# Altium PCB HONGGAN_拼版.PcbDoc (part 4 of 5)
Units mm, origin at the board's own origin, x right, y up, seen from the top; angles counter-clockwise.
Board outline 106.01 x 72.01 mm, 4 copper layers (Top Layer, Mid-Layer 1, Mid-Layer 2, Bottom Layer); 400 components, 0 nets, 1244 pads, 3211 vias.
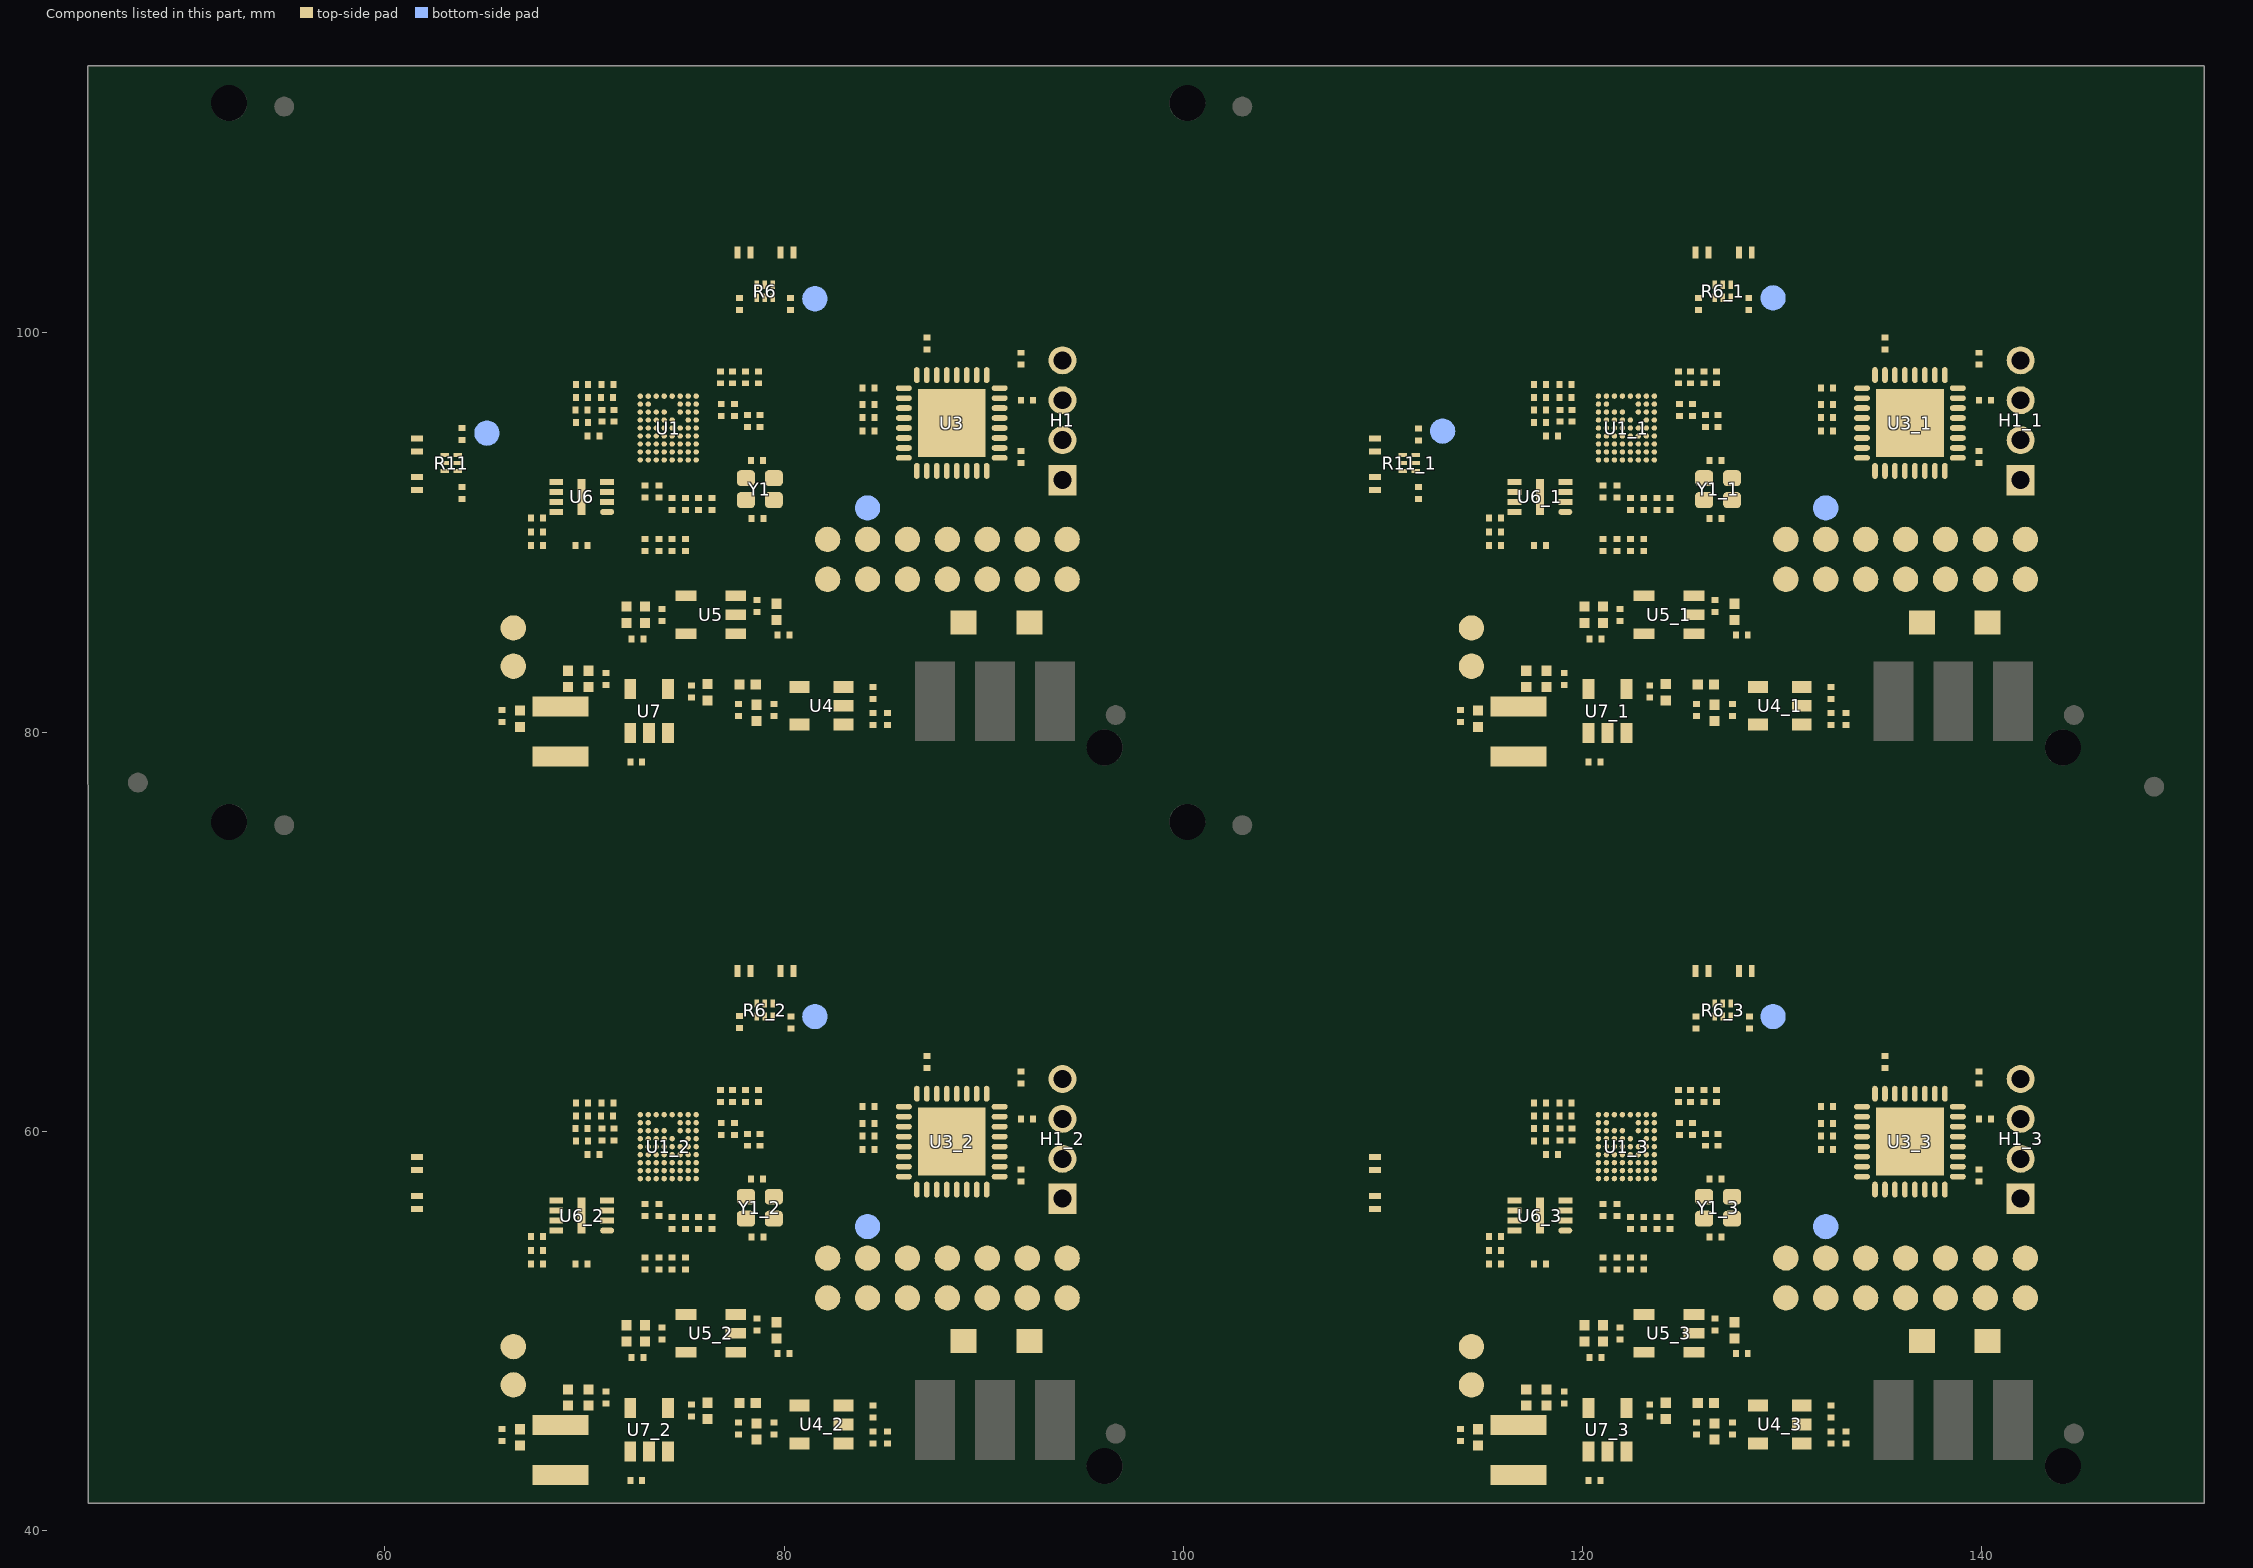
[diagram p6: the components of this part, seen from the top]

## Via types
v1: diameter 0.3, hole 0.2, Top Layer to Bottom Layer, tented both sides, 3151 vias
v2: diameter 0.5, hole 0.3, Top Layer to Bottom Layer, tented both sides, 48 vias
v3: diameter 0.3, hole 0.2, Top Layer to Bottom Layer, 12 vias

## Nets (pads, with @x,y where several pads share a name; then routed paths per layer and width w, separated by ;. In a path a pad name is that pad's centre, name@x,y a point inside that pad or via, vN(x,y) a via of type N, cw(c..) or ccw(c..) an arc to the next point about the centre after c; other vN are vias at no path point) (continued)
copper on no net: (continued)
  other v1: 51.929,42.384 52.413,42.384 52.932,42.384 53.45,42.384 53.993,42.384 54.511,42.384 55.03,42.384 55.549,42.384 56.067,42.384 56.586,42.384 57.105,42.384 57.623,42.384 58.142,42.384 58.661,42.384 59.179,42.384 59.698,42.384 60.217,42.384 60.735,42.384 61.17,42.384 61.811,42.384 62.446,42.384 62.954,42.384 63.589,42.384 64.269,42.384 99.929,42.384 100.413,42.384 100.932,42.384 101.45,42.384 101.993,42.384 102.511,42.384 103.03,42.384 103.549,42.384 104.067,42.384 104.586,42.384 105.105,42.384 105.623,42.384 106.142,42.384 106.661,42.384 107.179,42.384 107.698,42.384 108.217,42.384 108.735,42.384 109.17,42.384 109.811,42.384 110.446,42.384 110.954,42.384 111.589,42.384 112.269,42.384 50.889,42.824 53.454,42.83 65.113,42.824 75.273,42.824 77.305,42.824 79.337,42.824 81.369,42.824 83.401,42.824 85.433,42.824 87.465,42.824 89.497,42.824 91.529,42.824 93.561,42.824 98.889,42.824 113.113,42.824 123.273,42.824 125.305,42.824 127.337,42.824 129.369,42.824 131.401,42.824 133.433,42.824 135.465,42.824 137.497,42.824 139.529,42.824 141.561,42.824 62.9,42.86 51.905,42.87 99.905,42.87 64.269,43.076 112.269,43.076 53.454,43.365 51.905,43.389 62.9,43.395 99.905,43.389 64.269,43.595 112.269,43.595 77.076,43.796 125.076,43.796 53.454,43.9 51.905,43.908 99.905,43.908 62.9,43.93 125.054,44.061 64.269,44.114 112.269,44.114 106.144,44.218 77.076,44.262 77.479,44.262 125.479,44.262 51.929,44.387 99.929,44.387 125.076,44.387 53.454,44.435 62.9,44.465 64.269,44.544 112.269,44.544 77.076,44.705 125.076,44.705 74.257,44.856 122.257,44.856 51.929,44.906 99.929,44.906 53.454,44.97 62.9,45 65.494,45.076 113.494,45.076 64.269,45.145 112.269,45.145 51.929,45.424 99.929,45.424 65.494,45.432 113.494,45.432 65.75,45.455 113.75,45.455 53.454,45.505 62.9,45.535 64.269,45.785 112.269,45.785 51.929,45.943 99.929,45.943 53.454,46.04 62.9,46.07 64.269,46.297 112.269,46.297 51.929,46.462 99.929,46.462 53.454,46.575 62.9,46.605 64.269,46.752 112.269,46.751 50.889,46.888 85.433,46.888 95.593,46.888 98.889,46.888 133.433,46.888 143.593,46.888 51.929,46.98 99.929,46.98 53.454,47.11 62.9,47.14 64.269,47.268 112.269,47.268 51.929,47.499 99.929,47.499 53.454,47.645 62.9,47.675 64.269,47.862 72.987,47.845 73.283,47.845 112.269,47.862 120.987,47.845 121.283,47.845 51.929,48.018 99.929,48.018 72.946,48.099 120.946,48.099 53.454,48.18 62.9,48.21 78.854,48.319 79.362,48.319 79.743,48.319 126.854,48.319 127.362,48.319 127.743,48.319 64.269,48.463 112.269,48.463 51.929,48.536 99.929,48.536 53.454,48.715 62.9,48.745 68.161,48.92 84.417,48.92 86.449,48.92 90.513,48.92 94.577,48.92 96.609,48.92 116.161,48.92 132.417,48.92 134.449,48.92 138.513,48.92 142.577,48.92 144.609,48.92 51.929,49.055 99.929,49.055 64.269,49.102 112.269,49.102 53.454,49.25 62.9,49.28 51.929,49.574 99.929,49.574 64.269,49.614 112.269,49.614 51.929,50.082 52.413,50.082 52.932,50.082 53.45,50.082 53.993,50.082 54.511,50.082 55.03,50.082 55.549,50.082 56.067,50.082 56.586,50.082 57.105,50.082 57.623,50.082 58.142,50.082 58.661,50.082 59.179,50.082 59.698,50.082 60.217,50.082 60.735,50.082 61.17,50.082 62.126,50.082 62.594,50.082 63.113,50.082 63.632,50.082 99.929,50.082 100.413,50.082 100.932,50.082 101.45,50.082 101.993,50.082 102.511,50.082 103.03,50.082 103.549,50.082 104.067,50.082 104.586,50.082 105.105,50.082 105.623,50.082 106.142,50.082 106.661,50.082 107.179,50.082 107.698,50.082 108.217,50.082 108.735,50.082 109.17,50.082 110.126,50.082 110.594,50.082 111.113,50.082 111.632,50.082 64.269,50.13 112.269,50.13 61.039,50.861 62.219,50.861 109.039,50.861 110.219,50.861 50.889,50.952 52.921,50.952 54.953,50.952 56.985,50.952 59.017,50.952 63.081,50.952 65.113,50.952 67.145,50.952 69.177,50.952 71.209,50.952 73.241,50.952 81.369,50.952 98.889,50.952 100.921,50.952 102.953,50.952 104.985,50.952 107.017,50.952 111.081,50.952 113.113,50.952 115.145,50.952 117.177,50.952 119.209,50.952 121.241,50.952 129.369,50.952 61.039,51.379 62.219,51.379 109.039,51.379 110.219,51.379 61.039,51.898 62.219,51.898 109.039,51.898 110.219,51.898 61.039,52.417 62.219,52.417 109.039,52.417 110.219,52.417 61.04,52.961 62.219,52.961 109.04,52.961 110.219,52.961 51.905,52.984 53.937,52.984 55.969,52.984 58.001,52.984 60.033,52.984 64.097,52.984 96.609,52.984 99.905,52.984 101.937,52.984 103.969,52.984 106.001,52.984 108.033,52.984 112.097,52.984 144.609,52.984 61.04,53.48 62.219,53.48 109.04,53.48 110.219,53.48 61.04,53.998 62.219,53.998 109.04,53.998 110.219,53.998 78.084,54.188 78.666,54.188 79.292,54.188 126.084,54.188 126.666,54.188 127.292,54.188 77.59,54.406 125.59,54.406 61.04,54.517 62.219,54.517 109.04,54.517 110.219,54.517 79.613,54.667 127.613,54.667 77.59,54.856 125.59,54.856 80.223,54.988 128.223,54.988 50.889,55.016 52.921,55.016 54.953,55.016 56.985,55.016 59.017,55.016 63.081,55.016 65.113,55.016 87.465,55.016 93.561,55.016 98.889,55.016 100.921,55.016 102.953,55.016 104.985,55.016 107.017,55.016 111.081,55.016 113.113,55.016 135.465,55.016 141.561,55.016 61.04,55.036 62.219,55.036 109.04,55.036 110.219,55.036 69.304,55.084 117.304,55.084 76.382,55.118 124.382,55.118 70.256,55.267 118.256,55.267 77.305,55.306 125.305,55.306 61.039,55.521 62.214,55.515 62.214,55.515 109.039,55.521 110.214,55.515 110.214,55.515 110.608,55.602 62.608,55.631 80.223,55.623 128.223,55.623 76.925,55.789 124.925,55.789 63.306,55.856 111.306,55.856 70.312,55.868 118.312,55.868 112.019,56 64.019,56.088 80.223,56.173 128.223,56.173 76.797,56.323 124.797,56.323 64.766,56.4 112.766,56.4 69.354,56.561 117.354,56.561 62.391,56.694 110.391,56.694 80.223,56.723 128.223,56.723 62.903,56.787 65.336,56.787 110.903,56.787 113.244,56.787 76.797,56.923 124.797,56.923 63.492,56.942 111.492,56.942 51.905,57.048 53.937,57.048 55.969,57.048 58.001,57.048 60.033,57.048 68.161,57.048 96.609,57.048 99.905,57.048 101.937,57.048 103.969,57.048 106.001,57.048 108.033,57.048 116.161,57.048 144.609,57.048 64.019,57.159 112.019,57.159 80.156,57.19 128.156,57.19 65.704,57.265 62.374,57.313 62.374,57.313 110.374,57.313 110.374,57.313 76.574,57.43 124.574,57.43 79.734,57.512 127.734,57.512 64.562,57.562 112.562,57.562 62.329,57.608 110.329,57.608 66.097,57.64 75.192,57.633 114.097,57.629 123.192,57.633 63.042,57.748 111.042,57.748 62.332,57.905 110.332,57.905 79.412,57.934 127.412,57.934 65.042,57.965 113.042,57.965 63.833,58.074 111.833,58.074 66.515,58.147 114.515,58.147 60.806,58.216 62.483,58.216 63.075,58.216 108.733,58.216 110.483,58.216 111.081,58.216 64.35,58.312 79.04,58.306 112.35,58.312 127.04,58.306 60.01,58.391 91.91,58.386 139.91,58.386 73.592,58.433 73.992,58.433 74.392,58.433 74.792,58.433 108.033,58.413 121.592,58.433 121.992,58.433 122.392,58.433 122.792,58.433 65.569,58.461 113.569,58.461 77.512,58.536 78.084,58.536 78.575,58.536 125.512,58.536 126.084,58.536 126.575,58.536 77.024,58.626 87.506,58.635 88.396,58.635 89.285,58.635 125.024,58.626 135.506,58.635 136.396,58.635 137.285,58.635 67.073,58.658 115.073,58.658 59.309,58.716 64.766,58.728 112.766,58.728 73.592,58.833 73.992,58.833 74.392,58.833 74.792,58.833 75.192,58.833 121.592,58.833 121.992,58.833 122.392,58.833 122.792,58.833 123.192,58.833 107.269,58.866 76.797,58.894 124.797,58.894 66.097,58.926 114.097,58.926 52.921,59.08 54.953,59.08 56.985,59.08 100.921,59.08 102.953,59.08 104.985,59.08 83.932,59.094 131.932,59.094 58.723,59.19 62.608,59.19 63.306,59.19 65.244,59.19 67.608,59.19 106.757,59.19 110.608,59.19 111.306,59.19 113.244,59.19 115.608,59.19 61.958,59.245 73.192,59.233 73.592,59.233 73.992,59.233 74.392,59.233 74.792,59.233 109.958,59.245 121.192,59.233 121.592,59.233 121.992,59.233 122.392,59.233 122.792,59.233 61.159,59.286 63.954,59.286 109.159,59.286 111.954,59.286 60.535,59.401 66.577,59.422 108.535,59.401 114.577,59.422 87.505,59.484 88.395,59.484 89.285,59.484 135.505,59.484 136.395,59.484 137.285,59.484 70.867,59.548 71.467,59.548 118.867,59.548 119.467,59.548 106.144,59.623 73.592,59.633 73.992,59.633 74.392,59.633 121.592,59.633 121.992,59.633 122.392,59.633 52.441,59.783 53.08,59.783 53.681,59.783 54.275,59.783 54.791,59.783 55.334,59.783 55.969,59.783 56.481,59.783 57.12,59.783 57.721,59.783 58.315,59.783 60.033,59.783 60.545,59.783 61.184,59.783 61.785,59.783 62.379,59.783 62.896,59.783 63.438,59.783 63.954,59.783 64.375,59.783 68.208,59.783 100.441,59.783 101.08,59.783 101.681,59.783 102.275,59.783 102.791,59.783 103.334,59.783 103.969,59.783 104.481,59.783 105.12,59.783 105.721,59.783 108.033,59.783 108.545,59.783 109.184,59.783 109.785,59.783 110.379,59.783 110.896,59.783 111.438,59.783 111.954,59.783 112.375,59.783 113.724,59.793 116.208,59.783 76.849,59.828 77.514,59.825 124.849,59.828 125.514,59.825 65.825,59.841 78.158,59.878 78.793,59.878 126.158,59.878 126.793,59.878 115.073,59.999 66.979,60.033 73.592,60.033 73.992,60.033 74.792,60.033 75.192,60.033 121.592,60.033 121.992,60.033 122.792,60.033 123.192,60.033 64.766,60.148 112.766,60.148 53.529,60.23 62.975,60.26 51.929,60.269 99.929,60.269 64.375,60.299 112.375,60.299 87.506,60.403 88.396,60.403 89.285,60.403 135.506,60.403 136.396,60.403 137.285,60.403 73.192,60.433 74.792,60.433 121.192,60.433 122.792,60.433 66.097,60.539 68.573,60.516 114.097,60.539 116.573,60.516 67.47,60.589 115.328,60.586 53.529,60.765 70.837,60.768 118.837,60.768 51.929,60.788 62.975,60.795 99.929,60.788 64.375,60.834 65.228,60.842 72.792,60.833 73.592,60.833 74.792,60.833 112.375,60.834 113.228,60.842 120.792,60.833 121.592,60.833 122.792,60.833 67.694,61.112 72.225,61.112 80.353,61.112 92.545,61.112 96.609,61.112 115.703,61.112 120.225,61.112 128.353,61.112 140.545,61.112 144.609,61.112 83.932,61.234 131.932,61.234 53.529,61.3 66.298,61.283 74.877,61.3 114.298,61.283 122.877,61.3 51.929,61.307 99.929,61.307 62.975,61.33 64.375,61.35 73.591,61.332 112.375,61.35 121.602,61.332 65.417,61.422 70.839,61.422 113.324,61.417 116.846,61.422 118.839,61.422 72.733,61.443 120.733,61.443 68.846,61.561 115.907,61.597 106.144,61.618 67.78,61.641 51.929,61.787 99.929,61.787 123.076,61.803 53.529,61.835 62.975,61.865 64.375,61.944 112.375,61.944 66.515,61.981 114.515,61.981 73.58,61.996 65.632,62.018 113.632,62.018 121.599,62.021 75.184,62.054 76.803,62.076 77.407,62.076 78.073,62.076 124.803,62.076 125.407,62.076 126.073,62.076 72.5,62.148 120.5,62.148 67.907,62.256 68.903,62.256 115.951,62.256 116.903,62.256 123.372,62.246 51.929,62.306 99.929,62.306 53.529,62.37 62.975,62.4 73.496,62.516 75.592,62.514 121.517,62.514 64.375,62.545 112.375,62.545 123.661,62.64 65.724,62.661 113.724,62.661 66.67,62.787 74.55,62.791 114.67,62.787 122.55,62.791 51.929,62.824 72.212,62.827 99.929,62.824 120.212,62.827 73.403,62.901 121.403,62.901 53.529,62.905 62.975,62.935 68.136,62.971 69.215,62.971 116.173,62.971 117.215,62.971 124.049,63.021 75.999,63.04 50.889,63.144 65.113,63.144 67.145,63.144 71.209,63.144 77.305,63.144 79.337,63.144 83.401,63.144 85.433,63.144 89.497,63.144 98.889,63.144 113.113,63.144 115.145,63.144 119.209,63.144 125.305,63.144 127.337,63.144 131.401,63.144 133.433,63.144 137.497,63.144 64.375,63.185 112.375,63.185 122.868,63.244 65.824,63.263 113.824,63.263 124.515,63.29 71.663,63.326 74.55,63.331 119.663,63.326 122.527,63.331 51.929,63.343 99.929,63.343 75.047,63.382 76.582,63.382 53.529,63.44 69.555,63.46 117.555,63.46 62.975,63.47 66.872,63.469 114.872,63.469 125.08,63.526 68.468,63.549 70.221,63.549 70.987,63.549 72.937,63.549 73.436,63.544 77.339,63.549 116.515,63.549 118.221,63.549 118.987,63.549 120.937,63.549 121.44,63.549 125.637,63.613 123.208,63.662 64.375,63.697 112.375,63.697 78.194,63.72 126.194,63.72 51.929,63.862 99.929,63.862 74.36,63.888 122.36,63.888 126.653,63.919 66.062,63.944 114.062,63.944 75.658,63.946 123.548,63.963 53.529,63.975 62.975,64.005 67.213,64.043 115.213,64.043 72.344,64.055 120.344,64.055 73.259,64.074 121.259,64.074 68.903,64.105 78.916,64.101 116.903,64.105 64.375,64.152 112.375,64.151 123.966,64.231 127.106,64.305 76.334,64.364 51.929,64.38 71.608,64.395 99.929,64.38 119.608,64.395 124.476,64.388 69.323,64.427 117.323,64.427 72.996,64.492 77.058,64.483 120.996,64.492 125.058,64.483 53.529,64.51 70.05,64.506 70.812,64.506 118.05,64.506 118.812,64.506 62.975,64.54 79.316,64.546 74.213,64.573 77.834,64.573 122.229,64.573 125.593,64.571 67.663,64.585 115.663,64.585 66.451,64.629 114.451,64.629 64.375,64.668 112.375,64.668 127.406,64.691 126.071,64.734 51.929,64.899 72.593,64.895 99.929,64.899 120.593,64.895 68.221,65.019 78.408,65.028 116.221,65.019 126.408,65.028 53.529,65.045 62.975,65.075 72.112,65.081 120.112,65.081 79.484,65.108 127.484,65.108 66.898,65.126 114.898,65.126 125.686,65.152 66.129,65.176 70.193,65.176 74.257,65.176 76.289,65.176 77.768,65.176 84.417,65.176 86.449,65.176 88.481,65.176 90.513,65.176 92.545,65.176 94.577,65.176 96.609,65.176 114.129,65.176 118.193,65.176 122.257,65.176 124.289,65.176 132.417,65.176 134.449,65.176 136.481,65.176 138.513,65.176 140.545,65.176 142.577,65.176 144.609,65.176 64.375,65.262 112.375,65.262 73.687,65.294 68.918,65.345 116.918,65.345 121.672,65.345 51.929,65.418 71.663,65.407 99.929,65.418 119.663,65.407 69.663,65.485 117.663,65.484 71.089,65.516 119.089,65.516 67.47,65.548 115.47,65.548 53.529,65.58 70.376,65.578 73.089,65.593 118.376,65.578 121.089,65.593 62.975,65.61 64.375,65.863 112.375,65.863 51.929,65.936 68.112,65.934 99.929,65.936 116.112,65.934 120.5,65.945 72.55,66.047 53.529,66.115 62.975,66.145 68.779,66.213 116.779,66.213 77.898,66.298 80.13,66.298 125.898,66.298 128.13,66.298 119.881,66.312 71.027,66.415 71.85,66.415 119.027,66.415 51.929,66.455 99.929,66.455 69.529,66.461 70.221,66.461 117.412,66.461 118.221,66.461 64.375,66.502 112.375,66.502 77.544,66.612 80.406,66.612 125.544,66.612 128.406,66.612 53.529,66.65 62.975,66.68 80.664,66.889 128.664,66.889 51.929,66.974 77.305,66.989 79.067,66.989 99.929,66.974 125.305,66.989 127.067,66.989 64.375,67.014 112.375,67.014 78.708,67.072 126.708,67.072 50.889,67.208 65.113,67.208 67.145,67.208 69.177,67.208 71.209,67.208 73.241,67.208 75.273,67.208 79.536,67.218 80.861,67.218 81.369,67.208 83.401,67.208 85.433,67.208 87.465,67.208 89.497,67.208 91.529,67.208 93.561,67.208 95.593,67.208 98.889,67.208 113.113,67.208 115.145,67.208 117.177,67.208 119.209,67.208 121.241,67.208 123.273,67.208 127.536,67.218 128.861,67.218 129.369,67.208 131.401,67.208 133.433,67.208 135.465,67.208 137.497,67.208 139.529,67.208 141.561,67.208 143.593,67.208 77.058,67.353 125.058,67.353 78.45,67.454 79.822,67.454 126.45,67.454 127.822,67.454 51.929,67.482 52.519,67.482 53.037,67.482 53.556,67.482 54.098,67.482 54.617,67.482 55.136,67.482 55.654,67.482 56.173,67.482 56.692,67.482 57.21,67.482 57.729,67.482 58.248,67.482 58.766,67.482 59.285,67.482 59.804,67.482 60.322,67.482 60.841,67.482 61.276,67.482 61.728,67.482 62.232,67.482 62.7,67.482 63.219,67.482 63.737,67.482 99.929,67.482 100.519,67.482 101.037,67.482 101.556,67.482 102.098,67.482 102.617,67.482 103.136,67.482 103.654,67.482 104.173,67.482 104.692,67.482 105.21,67.482 105.729,67.482 106.248,67.482 106.766,67.482 107.285,67.482 107.804,67.482 108.322,67.482 108.841,67.482 109.276,67.482 109.728,67.482 110.232,67.482 110.7,67.482 111.219,67.482 111.737,67.482 64.375,67.53 112.375,67.53 81.167,67.585 81.686,67.585 82.204,67.585 82.723,67.585 83.242,67.585 83.76,67.585 84.355,67.585 84.94,67.585 85.516,67.585 86.027,67.585 129.167,67.585 129.686,67.585 130.204,67.585 130.723,67.585 131.242,67.585 131.76,67.585 132.355,67.585 132.94,67.585 133.516,67.585 134.027,67.585 76.924,67.779 78.916,67.779 79.258,67.779 124.924,67.779 126.916,67.779 127.258,67.779 86.488,67.842 134.488,67.842 86.949,68.08 134.949,68.08 76.648,68.338 124.648,68.338 129.167,68.419 129.686,68.419 130.204,68.419 130.723,68.419 81.167,68.49 81.686,68.49 82.204,68.49 82.723,68.49 90.688,68.661 138.688,68.661 65.494,68.673 66.006,68.673 66.645,68.673 67.246,68.673 67.84,68.673 68.357,68.673 68.899,68.673 69.534,68.673 70.046,68.673 70.686,68.673 71.287,68.673 71.881,68.673 72.479,68.673 72.987,68.673 73.598,68.673 74.11,68.673 74.75,68.673 75.351,68.673 75.945,68.673 76.334,68.673 77.94,68.673 83.147,68.673 83.659,68.673 84.298,68.673 84.899,68.673 85.493,68.673 86.01,68.673 87.699,68.673 88.339,68.673 88.94,68.673 89.534,68.673 90.132,68.673 91.251,68.673 91.763,68.673 92.403,68.673 93.004,68.673 93.598,68.673 94.114,68.673 94.656,68.673 95.173,68.673 95.593,68.673 113.494,68.673 114.006,68.673 114.645,68.673 115.246,68.673 115.84,68.673 116.357,68.673 116.899,68.673 117.534,68.673 118.046,68.673 118.686,68.673 119.287,68.673 119.881,68.673 120.479,68.673 120.987,68.673 121.598,68.673 122.11,68.673 122.75,68.673 123.351,68.673 123.945,68.673 124.461,68.673 125.94,68.673 131.147,68.673 131.659,68.673 132.298,68.673 132.899,68.673 133.493,68.673 134.01,68.673 135.699,68.673 136.339,68.673 136.94,68.673 137.534,68.673 138.132,68.673 139.251,68.673 139.763,68.673 140.403,68.673 141.004,68.673 141.598,68.673 142.114,68.673 142.656,68.673 143.173,68.673 143.593,68.673 65.494,69.159 67.036,69.159 83.147,69.159 84.647,69.159 113.494,69.159 131.147,69.159 77.94,69.189 94.093,69.189 95.593,69.189 125.94,69.189 143.593,69.189 51.905,69.24 53.937,69.24 55.969,69.24 58.001,69.24 60.033,69.24 62.065,69.24 64.097,69.24 78.321,69.24 80.353,69.24 82.385,69.24 96.609,69.24 99.905,69.24 101.937,69.24 103.969,69.24 106.001,69.24 108.033,69.24 110.065,69.24 112.097,69.24 126.321,69.24 128.353,69.24 130.385,69.24 144.609,69.24 65.494,69.678 83.147,69.678 113.494,69.678 131.147,69.678 67.036,69.694 84.647,69.694 76.482,69.724 77.94,69.724 94.093,69.724 95.593,69.724 125.94,69.724 143.593,69.724 65.494,70.197 83.147,70.197 113.494,70.197 131.147,70.197 67.036,70.229 77.94,70.24 84.647,70.229 95.593,70.24 125.94,70.24 143.593,70.24 76.482,70.259 94.093,70.259 119.726,70.547 137.337,70.547 65.494,70.677 83.147,70.677 113.494,70.677 131.147,70.677 67.036,70.764 84.647,70.764 76.482,70.794 94.093,70.794 77.94,70.834 95.593,70.834 125.94,70.834 143.593,70.834 65.494,71.196 83.147,71.196 113.494,71.196 131.147,71.196 50.889,71.272 52.921,71.272 54.953,71.272 56.985,71.272 59.017,71.272 61.049,71.272 63.081,71.272 65.113,71.272 79.337,71.272 81.369,71.272 98.889,71.272 100.921,71.272 102.953,71.272 104.985,71.272 107.017,71.272 109.049,71.272 111.081,71.272 113.113,71.272 127.337,71.272 129.369,71.272 67.036,71.299 84.647,71.299 76.482,71.329 94.093,71.329 77.94,71.435 95.593,71.435 125.94,71.435 143.593,71.435 65.494,71.714 83.147,71.714 113.494,71.714 131.147,71.714 67.036,71.834 84.647,71.834 76.482,71.864 94.093,71.864 77.94,72.075 95.593,72.075 125.94,72.075 143.593,72.075 65.494,72.233 83.147,72.233 113.494,72.233 131.147,72.233 67.036,72.369 84.647,72.369 76.482,72.399 94.093,72.399 77.94,72.587 95.593,72.587 125.94,72.587 143.593,72.587 65.494,72.752 83.147,72.752 113.494,72.752 131.147,72.752 67.036,72.904 84.647,72.904 76.482,72.934 94.093,72.934 77.94,73.042 95.593,73.042 125.94,73.041 143.593,73.041 65.494,73.27 83.147,73.27 113.494,73.27 131.147,73.27 51.905,73.304 53.937,73.304 55.969,73.304 58.001,73.304 60.033,73.304 62.065,73.304 64.097,73.304 78.321,73.304 80.353,73.304 82.385,73.304 96.609,73.304 99.905,73.304 101.937,73.304 103.969,73.304 106.001,73.304 108.033,73.304 110.065,73.304 112.097,73.304 126.321,73.304 128.353,73.304 130.385,73.304 144.609,73.304 67.036,73.439 84.647,73.439 76.482,73.469 94.093,73.469 77.94,73.558 95.593,73.558 125.94,73.558 143.593,73.558 65.494,73.789 83.147,73.789 113.494,73.789 131.147,73.789 67.036,73.974 84.647,73.974 76.482,74.004 94.093,74.004 77.94,74.152 95.593,74.152 125.94,74.152 143.593,74.152 65.494,74.308 83.147,74.308 113.494,74.308 131.147,74.308 67.036,74.509 84.647,74.509 76.482,74.539 94.093,74.539 77.94,74.753 95.593,74.753 125.94,74.753 143.593,74.753 65.494,74.826 83.147,74.826 113.494,74.826 131.147,74.826 67.036,75.044 84.647,75.044 76.482,75.074 94.093,75.074 50.889,75.336 56.985,75.336 59.017,75.336 61.049,75.336 63.081,75.336 65.113,75.336 65.494,75.345 79.337,75.336 81.369,75.336 83.147,75.345 98.889,75.336 104.985,75.336 107.017,75.336 109.049,75.336 111.081,75.336 113.113,75.336 113.494,75.345 127.337,75.336 129.369,75.336 131.147,75.345 77.94,75.392 95.593,75.392 125.94,75.392 143.593,75.392 67.036,75.579 84.647,75.579 76.482,75.609 94.093,75.609 65.494,75.864 83.147,75.864 113.494,75.864 131.147,75.864 77.94,75.904 95.593,75.904 125.94,75.904 143.593,75.904 65.494,76.372 66.084,76.372 66.603,76.372 67.121,76.372 67.664,76.372 68.182,76.372 68.701,76.372 69.22,76.372 69.738,76.372 70.257,76.372 70.776,76.372 71.294,76.372 71.813,76.372 72.332,76.372 72.85,76.372 73.369,76.372 73.888,76.372 74.406,76.372 74.841,76.372 75.293,76.372 75.797,76.372 76.265,76.372 76.784,76.372 77.303,76.372 83.147,76.372 83.737,76.372 84.256,76.372 84.774,76.372 85.317,76.372 85.835,76.372 86.354,76.372 86.873,76.372 87.391,76.372 87.91,76.372 88.429,76.372 88.947,76.372 89.466,76.372 89.985,76.372 90.503,76.372 91.022,76.372 91.541,76.372 92.059,76.372 92.494,76.372 92.946,76.372 93.45,76.372 93.918,76.372 94.437,76.372 94.956,76.372 113.494,76.372 114.084,76.372 114.603,76.372 115.121,76.372 115.664,76.372 116.182,76.372 116.701,76.372 117.22,76.372 117.738,76.372 118.257,76.372 118.776,76.372 119.294,76.372 119.813,76.372 120.332,76.372 120.85,76.372 121.369,76.372 121.888,76.372 122.406,76.372 122.841,76.372 123.293,76.372 123.797,76.372 124.265,76.372 124.784,76.372 125.303,76.372 131.147,76.372 131.737,76.372 132.256,76.372 132.774,76.372 133.317,76.372 133.835,76.372 134.354,76.372 134.873,76.372 135.391,76.372 135.91,76.372 136.429,76.372 136.947,76.372 137.466,76.372 137.985,76.372 138.503,76.372 139.022,76.372 139.541,76.372 140.059,76.372 140.494,76.372 140.946,76.372 141.45,76.372 141.918,76.372 142.437,76.372 142.956,76.372 77.94,76.42 95.593,76.42 125.94,76.42 143.593,76.42 51.929,78.384 52.413,78.384 52.932,78.384 53.45,78.384 53.993,78.384 54.511,78.384 55.03,78.384 55.549,78.384 56.067,78.384 56.586,78.384 57.105,78.384 57.623,78.384 58.142,78.384 58.661,78.384 59.179,78.384 59.698,78.384 60.217,78.384 60.735,78.384 61.17,78.384 61.811,78.384 62.446,78.384 62.954,78.384 63.589,78.384 64.269,78.384 99.929,78.384 100.413,78.384 100.932,78.384 101.45,78.384 101.993,78.384 102.511,78.384 103.03,78.384 103.549,78.384 104.067,78.384 104.586,78.384 105.105,78.384 105.623,78.384 106.142,78.384 106.661,78.384 107.179,78.384 107.698,78.384 108.217,78.384 108.735,78.384 109.17,78.384 109.811,78.384 110.446,78.384 110.954,78.384 111.589,78.384 112.269,78.384 50.889,78.72 65.113,78.72 75.273,78.72 77.305,78.72 79.337,78.72 81.369,78.72 83.401,78.72 85.433,78.72 87.465,78.72 89.497,78.72 91.529,78.72 93.561,78.72 98.889,78.824 113.113,78.824 123.273,78.824 125.305,78.824 127.337,78.824 129.369,78.824 131.401,78.824 133.433,78.824 135.465,78.824 137.497,78.824 139.529,78.824 141.561,78.824 53.454,78.83 51.905,78.87 62.9,78.86 99.905,78.87 64.269,79.076 112.269,79.076 53.454,79.365 51.905,79.389 62.9,79.395 99.905,79.389 64.269,79.595 112.269,79.595 77.076,79.796 125.076,79.796 51.905,79.908 53.454,79.9 99.905,79.908 62.9,79.93 77.054,80.061 125.054,80.061 64.269,80.114 112.269,80.114 106.144,80.218 77.479,80.262 125.479,80.262 51.929,80.387 77.076,80.387 99.929,80.387 125.076,80.387 53.454,80.435 62.9,80.465 64.269,80.544 112.269,80.544 77.076,80.705 125.076,80.705 122.257,80.856 51.929,80.906 99.929,80.906 53.454,80.97 62.9,81 65.494,81.076 113.494,81.076 64.269,81.145 112.269,81.145 51.929,81.424 65.494,81.432 99.929,81.424 113.494,81.432 65.75,81.455 113.75,81.455 53.454,81.505 62.9,81.535 64.269,81.785 112.269,81.785 51.929,81.943 99.929,81.943 53.454,82.04 62.9,82.07 64.269,82.297 112.269,82.297 51.929,82.462 99.929,82.462 53.454,82.575 62.9,82.605 64.269,82.752 112.269,82.751 50.889,82.784 85.433,82.784 95.593,82.784 98.889,82.888 133.433,82.888 143.593,82.888 51.929,82.98 99.929,82.98 53.454,83.11 62.9,83.14 64.269,83.268 112.269,83.268 51.929,83.499 99.929,83.499 53.454,83.645 62.9,83.675 72.987,83.845 73.283,83.845 120.987,83.845 121.283,83.845 64.269,83.862 112.269,83.862 51.929,84.018 99.929,84.018 72.946,84.099 120.946,84.099 53.454,84.18 62.9,84.21 78.854,84.319 79.362,84.319 79.743,84.319 126.854,84.319 127.362,84.319 127.743,84.319 64.269,84.463 112.269,84.463 51.929,84.536 99.929,84.536 53.454,84.715 62.9,84.745 68.161,84.816 84.417,84.816 86.449,84.816 90.513,84.816 94.577,84.816 96.609,84.816 116.161,84.92 132.417,84.92 134.449,84.92 138.513,84.92 142.577,84.92 144.609,84.92 51.929,85.055 99.929,85.055 64.269,85.102 112.269,85.102 53.454,85.25 62.9,85.28 51.929,85.574 99.929,85.574 64.269,85.614 112.269,85.614 51.929,86.082 52.413,86.082 52.932,86.082 53.45,86.082 53.993,86.082 54.511,86.082 55.03,86.082 55.549,86.082 56.067,86.082 56.586,86.082 57.105,86.082 57.623,86.082 58.142,86.082 58.661,86.082 59.179,86.082 59.698,86.082 60.217,86.082 60.735,86.082 61.17,86.082 62.126,86.082 62.594,86.082 63.113,86.082 63.632,86.082 99.929,86.082 100.413,86.082 100.932,86.082 101.45,86.082 101.993,86.082 102.511,86.082 103.03,86.082 103.549,86.082 104.067,86.082 104.586,86.082 105.105,86.082 105.623,86.082 106.142,86.082 106.661,86.082 107.179,86.082 107.698,86.082 108.217,86.082 108.735,86.082 109.17,86.082 110.126,86.082 110.594,86.082 111.113,86.082 111.632,86.082 64.269,86.13 112.269,86.13 50.889,86.848 52.921,86.848 54.953,86.848 56.985,86.848 59.017,86.848 63.081,86.848 65.113,86.848 67.145,86.848 69.177,86.848 71.209,86.848 73.241,86.848 81.369,86.848 61.039,86.861 62.219,86.861 109.039,86.861 110.219,86.861 98.889,86.952 100.921,86.952 102.953,86.952 104.985,86.952 107.017,86.952 111.081,86.952 113.113,86.952 115.145,86.952 117.177,86.952 119.209,86.952 121.241,86.952 129.369,86.952 61.039,87.379 62.219,87.379 109.039,87.379 110.219,87.379 61.039,87.898 62.219,87.898 109.039,87.898 110.219,87.898 61.039,88.417 62.219,88.417 109.039,88.417 110.219,88.417 51.905,88.88 53.937,88.88 55.969,88.88 58.001,88.88 60.033,88.88 64.097,88.88 96.609,88.88 61.04,88.961 62.219,88.961 109.04,88.961 110.219,88.961 99.905,88.984 101.937,88.984 103.969,88.984 106.001,88.984 108.033,88.984 112.097,88.984 144.609,88.984 61.04,89.48 62.219,89.48 109.04,89.48 110.219,89.48 61.04,89.998 62.219,89.998 109.04,89.998 110.219,89.998 78.084,90.188 78.666,90.188 79.292,90.188 126.084,90.188 126.666,90.188 127.292,90.188 77.59,90.406 125.59,90.406 61.04,90.517 62.219,90.517 109.04,90.517 110.219,90.517 79.613,90.667 127.613,90.667 77.59,90.856 125.59,90.856 50.889,90.912 52.921,90.912 54.953,90.912 56.985,90.912 59.017,90.912 65.113,90.912 87.465,90.912 93.561,90.912 80.223,90.988 128.223,90.988 98.889,91.016 100.921,91.016 102.953,91.016 104.985,91.016 107.017,91.016 113.113,91.016 135.465,91.016 141.561,91.016 61.04,91.036 62.219,91.036 109.04,91.036 110.219,91.036 69.304,91.084 117.304,91.084 76.382,91.118 124.382,91.118 70.256,91.267 118.256,91.267 77.305,91.306 125.305,91.306 61.039,91.521 62.214,91.515 109.039,91.521 110.214,91.515 80.223,91.623 128.223,91.623 63.858,91.668 111.778,91.679 76.925,91.789 124.925,91.789 70.312,91.868 118.312,91.868 62.436,91.93 110.436,91.93 80.223,92.173 128.223,92.173 76.797,92.323 124.797,92.323 69.354,92.561 117.354,92.561 80.223,92.723 128.223,92.723 76.797,92.923 124.797,92.923 51.905,92.944 53.937,92.944 55.969,92.944 58.001,92.944 60.033,92.944 68.161,92.944 96.609,92.944 99.905,93.048 101.937,93.048 103.969,93.048 106.001,93.048 108.033,93.048 116.161,93.048 144.609,93.048 80.156,93.19 128.156,93.19 62.374,93.313 110.374,93.313 76.574,93.43 124.574,93.43 79.734,93.512 127.734,93.512 75.192,93.633 123.192,93.633 64.968,93.696 112.985,93.688 62.332,93.905 110.332,93.905 79.412,93.934 127.412,93.934 65.329,94.019 113.317,94.04 60.684,94.216 108.545,94.276 79.04,94.306 127.04,94.306 91.91,94.386 139.91,94.386 73.592,94.433 73.992,94.433 74.392,94.433 74.792,94.433 113.743,94.446 121.592,94.433 121.992,94.433 122.392,94.433 122.792,94.433 63.08,94.528 77.512,94.536 78.084,94.536 78.575,94.536 111.08,94.528 125.512,94.536 126.084,94.536 126.575,94.536 60.03,94.581 108.03,94.581 77.024,94.626 87.506,94.635 88.396,94.635 89.285,94.635 135.506,94.635 136.396,94.635 137.285,94.635 125.174,94.698 66.125,94.828 62.675,94.84 73.592,94.833 73.992,94.833 74.392,94.833 74.792,94.833 75.192,94.833 110.675,94.84 114.116,94.839 121.592,94.833 121.992,94.833 122.392,94.833 122.792,94.833 123.192,94.833 59.336,94.884 76.797,94.894 107.336,94.884 52.921,94.976 54.953,94.976 56.985,94.976 63.081,94.976 100.921,95.08 102.953,95.08 104.985,95.08 111.081,95.08 83.932,95.094 131.932,95.094 66.417,95.198 114.412,95.203 73.192,95.233 73.592,95.233 73.992,95.233 74.392,95.233 74.792,95.233 121.192,95.233 121.592,95.233 121.992,95.233 122.392,95.233 122.792,95.233 61.958,95.245 109.958,95.245 61.159,95.286 109.159,95.286 58.831,95.313 106.831,95.313 60.535,95.401 108.535,95.401 87.505,95.484 88.395,95.484 89.285,95.484 135.505,95.484 136.395,95.484 137.285,95.484 70.867,95.548 71.467,95.548 118.867,95.548 119.467,95.548 66.711,95.611 114.69,95.597 73.592,95.633 73.992,95.633 74.392,95.633 121.592,95.633 121.992,95.633 122.392,95.633 52.441,95.783 53.08,95.783 53.681,95.783 54.275,95.783 54.791,95.783 55.334,95.783 55.969,95.783 56.481,95.783 57.12,95.783 57.721,95.783 58.315,95.783 60.033,95.783 60.545,95.783 61.184,95.783 61.785,95.783 62.379,95.783 62.896,95.783 63.438,95.783 63.954,95.783 64.375,95.783 100.441,95.783 101.08,95.783 101.681,95.783 102.275,95.783 102.791,95.783 103.334,95.783 103.969,95.783 104.481,95.783 105.12,95.783 105.721,95.783 106.315,95.783 108.033,95.783 108.545,95.783 109.184,95.783 109.785,95.783 110.379,95.783 110.896,95.783 111.438,95.783 111.954,95.783 112.375,95.783 76.849,95.828 77.514,95.825 124.849,95.828 125.514,95.825 78.158,95.878 78.793,95.878 126.158,95.878 126.793,95.878 65.883,95.998 113.883,95.998 73.592,96.033 73.992,96.033 74.792,96.033 75.192,96.033 121.592,96.033 121.992,96.033 122.792,96.033 123.192,96.033 66.943,96.057 114.908,96.069 53.454,96.23 51.929,96.269 62.9,96.26 99.929,96.269 64.375,96.299 112.375,96.299 87.506,96.403 88.396,96.403 89.285,96.403 135.506,96.403 136.396,96.403 137.285,96.403 73.192,96.433 74.792,96.433 121.192,96.433 122.792,96.433 66.04,96.52 115.017,96.553 113.959,96.574 66.978,96.598 53.454,96.765 70.837,96.768 118.837,96.768 51.929,96.788 62.9,96.795 99.929,96.788 64.375,96.834 72.792,96.833 73.592,96.833 73.992,96.833 74.792,96.833 112.375,96.834 120.792,96.833 121.592,96.833 121.992,96.833 122.792,96.833 68.161,97.008 72.225,97.008 80.353,97.008 96.609,97.008 66.087,97.03 114.087,97.03 115.031,97.079 66.987,97.106 116.161,97.112 120.225,97.112 128.353,97.112 140.545,97.112 144.609,97.112 83.932,97.234 131.932,97.234 51.929,97.307 53.454,97.3 73.64,97.308 74.888,97.3 99.929,97.307 122.905,97.307 62.9,97.33 121.648,97.332 64.375,97.35 74,97.347 112.375,97.35 122,97.347 70.839,97.422 72.733,97.443 118.839,97.422 120.733,97.443 66.167,97.536 67.131,97.597 114.13,97.598 115.131,97.597 106.144,97.618 73.601,97.667 74.993,97.673 121.601,97.667 122.993,97.673 74.103,97.734 122.066,97.756 51.929,97.787 99.929,97.787 53.454,97.835 62.9,97.865 120.644,97.871 72.676,97.892 64.375,97.944 112.375,97.944 67.467,98.015 73.602,98.027 114.293,98.03 115.434,98.021 121.628,98.028 66.293,98.079 75.19,98.062 76.803,98.076 77.407,98.076 78.073,98.076 123.2,98.08 124.803,98.076 125.407,98.076 126.073,98.076 74.228,98.106 122.127,98.133 72.55,98.255 120.55,98.255 51.929,98.306 99.929,98.306 53.454,98.37 62.9,98.4 75.44,98.41 123.44,98.41 66.548,98.425 67.831,98.418 114.492,98.418 115.831,98.418 74.346,98.449 73.506,98.466 121.506,98.466 122.333,98.469 64.375,98.545 112.375,98.545 120.323,98.657 116.226,98.67 68.216,98.7 72.346,98.731 75.758,98.748 114.772,98.765 123.76,98.765 74.55,98.791 122.55,98.791 51.929,98.824 99.929,98.824 66.797,98.86 73.434,98.894 53.454,98.905 121.43,98.916 62.9,98.935 50.889,99.04 65.113,99.04 68.622,99.04 71.995,99.04 77.305,99.04 79.337,99.04 83.401,99.04 85.433,99.04 89.497,99.04 116.622,99.04 119.995,99.04 76.078,99.072 124.078,99.072 74.749,99.122 98.889,99.144 113.113,99.144 115.12,99.128 119.209,99.144 125.305,99.144 127.337,99.144 131.401,99.144 133.433,99.144 137.497,99.144 122.735,99.159 64.375,99.185 67.056,99.187 112.375,99.185 73.198,99.248 121.198,99.248 71.631,99.287 119.668,99.285 117.114,99.326 51.929,99.343 69.091,99.35 99.929,99.343 124.474,99.34 76.44,99.366 75.047,99.382 123.047,99.382 53.454,99.44 62.9,99.47 67.372,99.46 69.555,99.46 115.372,99.46 117.555,99.46 76.819,99.5 124.819,99.5 70.025,99.551 70.457,99.542 70.869,99.546 71.286,99.542 72.969,99.546 118.029,99.537 118.457,99.542 118.876,99.537 119.286,99.542 120.993,99.578 125.292,99.605 75.325,99.647 77.27,99.646 123.304,99.661 126.139,99.678 64.375,99.697 67.818,99.695 77.687,99.684 77.691,99.684 78.128,99.707 112.375,99.697 125.691,99.684 115.83,99.742 72.66,99.81 120.66,99.81 51.929,99.862 99.929,99.862 78.502,99.893 126.502,99.893 75.658,99.946 123.658,99.946 53.454,99.975 62.9,100.005 68.161,99.989 72.346,100.074 120.364,100.077 126.846,100.12 64.375,100.152 78.848,100.148 112.375,100.151 116.161,100.151 75.99,100.195 123.961,100.21 68.546,100.226 71.988,100.245 116.581,100.248 119.988,100.245 68.928,100.362 76.334,100.364 124.334,100.364 51.929,100.38 99.929,100.38 79.067,100.396 116.899,100.395 127.067,100.396 71.607,100.423 76.719,100.438 119.579,100.432 69.342,100.457 77.058,100.483 125.058,100.483 53.454,100.51 69.709,100.513 70.457,100.513 71.209,100.513 117.285,100.507 117.709,100.513 118.413,100.513 119.209,100.513 124.732,100.496 62.9,100.54 70.807,100.539 77.455,100.527 118.814,100.541 70.066,100.563 77.834,100.573 118.063,100.596 125.446,100.577 125.834,100.573 64.375,100.668 112.375,100.668 79.35,100.698 78.17,100.731 126.146,100.746 127.369,100.724 51.929,100.899 99.929,100.899 78.408,101.028 126.408,101.028 53.454,101.045 62.9,101.075 66.129,101.072 68.161,101.072 70.193,101.072 72.225,101.072 74.257,101.072 76.289,101.072 84.417,101.072 86.449,101.072 88.481,101.072 90.513,101.072 92.545,101.072 94.577,101.072 96.609,101.072 79.484,101.108 127.484,101.108 77.768,101.152 125.813,101.152 114.129,101.176 116.161,101.176 118.193,101.176 120.225,101.176 122.257,101.176 124.289,101.176 130.385,101.176 132.417,101.176 134.449,101.176 136.481,101.176 138.513,101.176 140.545,101.176 142.577,101.176 144.609,101.176 64.375,101.262 112.375,101.262 51.929,101.418 99.929,101.418 53.454,101.58 62.9,101.61 64.375,101.863 112.375,101.863 51.929,101.936 99.929,101.936 53.454,102.115 62.9,102.145 77.898,102.298 80.13,102.298 125.898,102.298 128.13,102.298 51.929,102.455 99.929,102.455 64.375,102.502 112.375,102.502 77.544,102.612 80.406,102.612 125.544,102.612 128.406,102.612 53.454,102.65 62.9,102.68 77.232,102.889 80.664,102.889 128.664,102.889 51.929,102.974 99.929,102.974 79.067,102.989 125.305,102.989 127.067,102.989 64.375,103.014 112.375,103.014 78.708,103.072 126.708,103.072 50.889,103.104 65.113,103.104 67.145,103.104 69.177,103.104 71.209,103.104 73.241,103.104 75.273,103.104 81.369,103.104 83.401,103.104 85.433,103.104 87.465,103.104 89.497,103.104 91.529,103.104 93.561,103.104 95.593,103.104 98.889,103.208 113.113,103.208 115.145,103.208 117.177,103.208 119.209,103.208 121.241,103.208 123.273,103.208 129.369,103.208 131.401,103.208 133.433,103.208 135.465,103.208 137.497,103.208 139.529,103.208 141.561,103.208 143.593,103.208 79.536,103.218 80.861,103.218 127.536,103.218 128.861,103.218 77.058,103.353 125.058,103.353 78.45,103.454 79.822,103.454 126.45,103.454 127.822,103.454 51.929,103.482 52.519,103.482 53.037,103.482 53.556,103.482 54.098,103.482 54.617,103.482 55.136,103.482 55.654,103.482 56.173,103.482 56.692,103.482 57.21,103.482 57.729,103.482 58.248,103.482 58.766,103.482 59.285,103.482 59.804,103.482 60.322,103.482 60.841,103.482 61.276,103.482 61.728,103.482 62.232,103.482 62.7,103.482 63.219,103.482 63.737,103.482 99.929,103.482 100.519,103.482 101.037,103.482 101.556,103.482 102.098,103.482 102.617,103.482 103.136,103.482 103.654,103.482 104.173,103.482 104.692,103.482 105.21,103.482 105.729,103.482 106.248,103.482 106.766,103.482 107.285,103.482 107.804,103.482 108.322,103.482 108.841,103.482 109.276,103.482 109.728,103.482 110.232,103.482 110.7,103.482 111.219,103.482 111.737,103.482 64.375,103.53 112.375,103.53 81.167,103.585 81.686,103.585 82.204,103.585 82.723,103.585 83.242,103.585 83.76,103.585 84.355,103.585 84.94,103.585 85.516,103.585 86.027,103.585 129.167,103.585 129.686,103.585 130.204,103.585 130.723,103.585 131.242,103.585 131.76,103.585 132.355,103.585 132.94,103.585 133.516,103.585 134.027,103.585 76.924,103.779 78.916,103.779 79.258,103.779 124.924,103.779 126.916,103.779 127.258,103.779 86.488,103.842 134.488,103.842 86.949,104.08 134.949,104.08 76.648,104.338 124.648,104.338 81.167,104.419 81.686,104.419 82.204,104.419 82.723,104.419 129.167,104.419 129.686,104.419 130.204,104.419 130.723,104.419 90.688,104.661 138.688,104.661 65.494,104.673 66.006,104.673 66.645,104.673 67.246,104.673 67.84,104.673 68.357,104.673 68.899,104.673 69.534,104.673 70.046,104.673 70.686,104.673 71.287,104.673 71.881,104.673 72.479,104.673 72.987,104.673 73.598,104.673 74.11,104.673 74.75,104.673 75.351,104.673 75.945,104.673 76.461,104.673 77.94,104.673 83.147,104.673 83.659,104.673 84.298,104.673 84.899,104.673 85.493,104.673 86.01,104.673 87.699,104.673 88.339,104.673 88.94,104.673 89.534,104.673 90.132,104.673 91.251,104.673 91.763,104.673 92.403,104.673 93.004,104.673 93.598,104.673 94.114,104.673 94.656,104.673 95.173,104.673 95.593,104.673 113.494,104.673 114.006,104.673 114.645,104.673 115.246,104.673 115.84,104.673 116.357,104.673 116.899,104.673 117.534,104.673 118.046,104.673 118.686,104.673 119.287,104.673 119.881,104.673 120.479,104.673 120.987,104.673 121.598,104.673 122.11,104.673 122.75,104.673 123.351,104.673 123.945,104.673 124.461,104.673 125.94,104.673 131.147,104.673 131.659,104.673 132.298,104.673 132.899,104.673 133.493,104.673 134.01,104.673 135.699,104.673 136.339,104.673 136.94,104.673 137.534,104.673 138.132,104.673 139.251,104.673 139.763,104.673 140.403,104.673 141.004,104.673 141.598,104.673 142.114,104.673 142.656,104.673 143.173,104.673 143.593,104.673 51.905,105.136 53.937,105.136 55.969,105.136 58.001,105.136 60.033,105.136 62.065,105.136 64.097,105.136 78.321,105.136 80.353,105.136 82.385,105.136 96.609,105.136 65.494,105.159 67.036,105.159 83.147,105.159 84.647,105.159 113.494,105.159 131.147,105.159 77.94,105.189 94.093,105.189 95.593,105.189 125.94,105.189 143.593,105.189 99.905,105.24 101.937,105.24 103.969,105.24 106.001,105.24 108.033,105.24 110.065,105.24 112.097,105.24 126.321,105.24 128.353,105.24 130.385,105.24 144.609,105.24 65.494,105.678 67.036,105.694 83.147,105.678 84.647,105.694 113.494,105.678 131.147,105.678 76.482,105.724 77.94,105.724 94.093,105.724 95.593,105.724 125.94,105.724 143.593,105.724 65.494,106.197 83.147,106.197 113.494,106.197 131.147,106.197 67.036,106.229 84.647,106.229 76.482,106.259 77.94,106.24 94.093,106.259 95.593,106.24 125.94,106.24 143.593,106.24 119.726,106.547 137.337,106.547 65.494,106.677 83.147,106.677 113.494,106.677 131.147,106.677 67.036,106.764 84.647,106.764 76.482,106.794 94.093,106.794 77.94,106.834 95.593,106.834 125.94,106.834 143.593,106.834 50.889,107.168 52.921,107.168 54.953,107.168 56.985,107.168 59.017,107.168 61.049,107.168 63.081,107.168 65.113,107.168 79.337,107.168 81.369,107.168 65.494,107.196 83.147,107.196 113.494,107.196 131.147,107.196 98.889,107.272 100.921,107.272 102.953,107.272 104.985,107.272 107.017,107.272 109.049,107.272 111.081,107.272 113.113,107.272 127.337,107.272 129.369,107.272 67.036,107.299 84.647,107.299 76.482,107.329 94.093,107.329 77.94,107.435 95.593,107.435 125.94,107.435 143.593,107.435 65.494,107.714 83.147,107.714 113.494,107.714 131.147,107.714 67.036,107.834 84.647,107.834 76.482,107.864 94.093,107.864 77.94,108.075 95.593,108.075 125.94,108.075 143.593,108.075 65.494,108.233 83.147,108.233 113.494,108.233 131.147,108.233 67.036,108.369 84.647,108.369 76.482,108.399 94.093,108.399 77.94,108.587 95.593,108.587 125.94,108.587 143.593,108.587 65.494,108.752 83.147,108.752 113.494,108.752 131.147,108.752 67.036,108.904 84.647,108.904 76.482,108.934 94.093,108.934 77.94,109.042 95.593,109.042 125.94,109.041 143.593,109.041 51.905,109.2 53.937,109.2 55.969,109.2 58.001,109.2 60.033,109.2 62.065,109.2 64.097,109.2 78.321,109.2 80.353,109.2 82.385,109.2 96.609,109.2 65.494,109.27 83.147,109.27 113.494,109.27 131.147,109.27 99.905,109.304 101.937,109.304 103.969,109.304 106.001,109.304 108.033,109.304 110.065,109.304 112.097,109.304 126.321,109.304 128.353,109.304 130.385,109.304 144.609,109.304 67.036,109.439 84.647,109.439 76.482,109.469 94.093,109.469 77.94,109.558 95.593,109.558 125.94,109.558 143.593,109.558 65.494,109.789 83.147,109.789 113.494,109.789 131.147,109.789 67.036,109.974 84.647,109.974 76.482,110.004 94.093,110.004 77.94,110.152 95.593,110.152 125.94,110.152 143.593,110.152 65.494,110.308 83.147,110.308 113.494,110.308 131.147,110.308 67.036,110.509 84.647,110.509 76.482,110.539 94.093,110.539 77.94,110.753 95.593,110.753 125.94,110.753 143.593,110.753 65.494,110.826 83.147,110.826 113.494,110.826 131.147,110.826 67.036,111.044 84.647,111.044 76.482,111.074 94.093,111.074 50.889,111.232 56.985,111.232 59.017,111.232 61.049,111.232 63.081,111.232 65.113,111.232 79.337,111.232 81.369,111.232 98.889,111.336 104.985,111.336 107.017,111.336 109.049,111.336 111.081,111.336 113.113,111.336 127.337,111.336 129.369,111.336 65.494,111.345 83.147,111.345 113.494,111.345 131.147,111.345 77.94,111.392 95.593,111.392 125.94,111.392 143.593,111.392 67.036,111.579 84.647,111.579 76.482,111.609 94.093,111.609 65.494,111.864 83.147,111.864 113.494,111.864 131.147,111.864 77.94,111.904 95.593,111.904 125.94,111.904 143.593,111.904 65.494,112.372 66.084,112.372 66.603,112.372 67.121,112.372 67.664,112.372 68.182,112.372 68.701,112.372 69.22,112.372 69.738,112.372 70.257,112.372 70.776,112.372 71.294,112.372 71.813,112.372 72.332,112.372 72.85,112.372 73.369,112.372 73.888,112.372 74.406,112.372 74.841,112.372 75.293,112.372 75.797,112.372 76.265,112.372 76.784,112.372 77.303,112.372 83.147,112.372 83.737,112.372 84.256,112.372 84.774,112.372 85.317,112.372 85.835,112.372 86.354,112.372 86.873,112.372 87.391,112.372 87.91,112.372 88.429,112.372 88.947,112.372 89.466,112.372 89.985,112.372 90.503,112.372 91.022,112.372 91.541,112.372 92.059,112.372 92.494,112.372 92.946,112.372 93.45,112.372 93.918,112.372 94.437,112.372 94.956,112.372 113.494,112.372 114.084,112.372 114.603,112.372 115.121,112.372 115.664,112.372 116.182,112.372 116.701,112.372 117.22,112.372 117.738,112.372 118.257,112.372 118.776,112.372 119.294,112.372 119.813,112.372 120.332,112.372 120.85,112.372 121.369,112.372 121.888,112.372 122.406,112.372 122.841,112.372 123.293,112.372 123.797,112.372 124.265,112.372 124.784,112.372 125.303,112.372 131.147,112.372 131.737,112.372 132.256,112.372 132.774,112.372 133.317,112.372 133.835,112.372 134.354,112.372 134.873,112.372 135.391,112.372 135.91,112.372 136.429,112.372 136.947,112.372 137.466,112.372 137.985,112.372 138.503,112.372 139.022,112.372 139.541,112.372 140.059,112.372 140.494,112.372 140.946,112.372 141.45,112.372 141.918,112.372 142.437,112.372 142.956,112.372 77.94,112.42 95.593,112.42 125.94,112.42 143.593,112.42
  other v2: 70.701,58.259 118.701,58.259 78.321,60.545 126.321,60.545 79.734,62.054 127.734,62.054 70.701,94.259 118.701,94.259 78.321,96.545 126.321,96.545 79.734,98.054 127.734,98.054 70.757,98.514 118.757,98.514
  other v3: 58.144,44.97 58.144,62.37 71.726,71.299 89.337,71.299

## Polygon pours and split planes (outlines as drawn)
no net on Mid-Layer 1 "NONET_L-01_P-001" (solid, pour order 10): 98.127,79.368 98.127,111.368 cw(c100.127,111.368) 100.127,113.368 144.127,113.368 cw(c144.127,111.368) 146.127,111.368 146.127,79.368 cw(c144.127,79.368) 144.127,77.368 100.127,77.368 cw(c100.127,79.368)
no net on Mid-Layer 1 "NONET_L-01_P-001" (solid, pour order 1): 50.127,79.368 ccw(c52.127,79.368) 52.127,77.368 96.127,77.368 ccw(c96.127,79.368) 98.127,79.368 98.127,111.368 ccw(c96.127,111.368) 96.127,113.368 52.127,113.368 ccw(c52.127,111.368) 50.127,111.368
no net on Mid-Layer 1 "NONET_L-01_P-001" (solid, pour order 30): 98.127,43.368 98.127,75.368 cw(c100.127,75.368) 100.127,77.368 144.127,77.368 cw(c144.127,75.368) 146.127,75.368 146.127,43.368 cw(c144.127,43.368) 144.127,41.368 100.127,41.368 cw(c100.127,43.368)
no net on Mid-Layer 1 "NONET_L-01_P-001" (solid, pour order 14): 50.127,43.368 50.127,75.368 cw(c52.127,75.368) 52.127,77.368 96.127,77.368 cw(c96.127,75.368) 98.127,75.368 98.127,43.368 cw(c96.127,43.368) 96.127,41.368 52.127,41.368 cw(c52.127,43.368)
no net on Mid-Layer 2 "NONET_L-01_P-001" (solid, pour order 11): 98.127,79.368 98.127,111.368 cw(c100.127,111.368) 100.127,113.368 144.127,113.368 cw(c144.127,111.368) 146.127,111.368 146.127,79.368 cw(c144.127,79.368) 144.127,77.368 100.127,77.368 cw(c100.127,79.368)
no net on Mid-Layer 2 "NONET_L-01_P-001" (solid, pour order 2): 50.127,79.368 ccw(c52.127,79.368) 52.127,77.368 96.127,77.368 ccw(c96.127,79.368) 98.127,79.368 98.127,111.368 ccw(c96.127,111.368) 96.127,113.368 52.127,113.368 ccw(c52.127,111.368) 50.127,111.368
no net on Mid-Layer 2 "NONET_L-01_P-001" (solid, pour order 32): 98.127,43.368 98.127,75.368 cw(c100.127,75.368) 100.127,77.368 144.127,77.368 cw(c144.127,75.368) 146.127,75.368 146.127,43.368 cw(c144.127,43.368) 144.127,41.368 100.127,41.368 cw(c100.127,43.368)
no net on Mid-Layer 2 "NONET_L-01_P-001" (solid, pour order 15): 50.127,43.368 50.127,75.368 cw(c52.127,75.368) 52.127,77.368 96.127,77.368 cw(c96.127,75.368) 98.127,75.368 98.127,43.368 cw(c96.127,43.368) 96.127,41.368 52.127,41.368 cw(c52.127,43.368)
no net on Top Layer "NONET_L-01_P-001" (solid, pour order 36): 98.127,79.368 98.127,111.368 cw(c100.127,111.368) 100.127,113.368 144.127,113.368 cw(c144.127,111.368) 146.127,111.368 146.127,79.368 cw(c144.127,79.368) 144.127,77.368 100.127,77.368 cw(c100.127,79.368)
no net on Top Layer "NONET_L-01_P-001" (solid, pour order 35): 50.127,79.368 ccw(c52.127,79.368) 52.127,77.368 96.127,77.368 ccw(c96.127,79.368) 98.127,79.368 98.127,111.368 ccw(c96.127,111.368) 96.127,113.368 52.127,113.368 ccw(c52.127,111.368) 50.127,111.368
no net on Top Layer "NONET_L-01_P-001" (solid, pour order 34): 98.127,43.368 98.127,75.368 cw(c100.127,75.368) 100.127,77.368 144.127,77.368 cw(c144.127,75.368) 146.127,75.368 146.127,43.368 cw(c144.127,43.368) 144.127,41.368 100.127,41.368 cw(c100.127,43.368)
no net on Top Layer "NONET_L-01_P-001" (solid, pour order 33): 50.127,43.368 50.127,75.368 cw(c52.127,75.368) 52.127,77.368 96.127,77.368 cw(c96.127,75.368) 98.127,75.368 98.127,43.368 cw(c96.127,43.368) 96.127,41.368 52.127,41.368 cw(c52.127,43.368)
no net on Bottom Layer "NONET_L-01_P-001" (solid, pour order 12): 98.127,79.368 98.127,111.368 cw(c100.127,111.368) 100.127,113.368 144.127,113.368 cw(c144.127,111.368) 146.127,111.368 146.127,79.368 cw(c144.127,79.368) 144.127,77.368 100.127,77.368 cw(c100.127,79.368)
no net on Bottom Layer "NONET_L-01_P-001" (solid, pour order 3): 50.127,79.368 ccw(c52.127,79.368) 52.127,77.368 96.127,77.368 ccw(c96.127,79.368) 98.127,79.368 98.127,111.368 ccw(c96.127,111.368) 96.127,113.368 52.127,113.368 ccw(c52.127,111.368) 50.127,111.368
no net on Bottom Layer "NONET_L-01_P-001" (solid, pour order 31): 98.127,43.368 98.127,75.368 cw(c100.127,75.368) 100.127,77.368 144.127,77.368 cw(c144.127,75.368) 146.127,75.368 146.127,43.368 cw(c144.127,43.368) 144.127,41.368 100.127,41.368 cw(c100.127,43.368)
no net on Bottom Layer "NONET_L-01_P-001" (solid, pour order 28): 100.644,42.968 111.644,42.968 111.644,49.468 100.644,49.468
no net on Bottom Layer "NONET_L-01_P-001" (solid, pour order 27): 131.837,69.297 142.837,69.297 142.837,75.797 131.837,75.797
no net on Bottom Layer "NONET_L-01_P-001" (solid, pour order 26): 114.226,69.297 125.226,69.297 125.226,75.797 114.226,75.797
no net on Bottom Layer "NONET_L-01_P-001" (solid, pour order 25): 100.644,60.368 111.644,60.368 111.644,66.868 100.644,66.868
no net on Bottom Layer "NONET_L-01_P-001" (solid, pour order 16): 50.127,43.368 50.127,75.368 cw(c52.127,75.368) 52.127,77.368 96.127,77.368 cw(c96.127,75.368) 98.127,75.368 98.127,43.368 cw(c96.127,43.368) 96.127,41.368 52.127,41.368 cw(c52.127,43.368)
no net on Bottom Layer "NONET_L-01_P-001" (solid, pour order 8): 131.837,105.297 142.837,105.297 142.837,111.797 131.837,111.797
no net on Bottom Layer "NONET_L-01_P-001" (solid, pour order 7): 114.226,105.297 125.226,105.297 125.226,111.797 114.226,111.797